# Altium PCB powermodule.PcbDoc (part 2 of 2)
Units mil, origin at the board's own origin, x right, y up, seen from the top; angles counter-clockwise.
Board outline 3937.01 x 1771.65 mil, 2 copper layers (Top, Bottom); 128 components, 96 nets, 567 pads, 424 vias.
Unrouted connection lines stored in the file: 15.
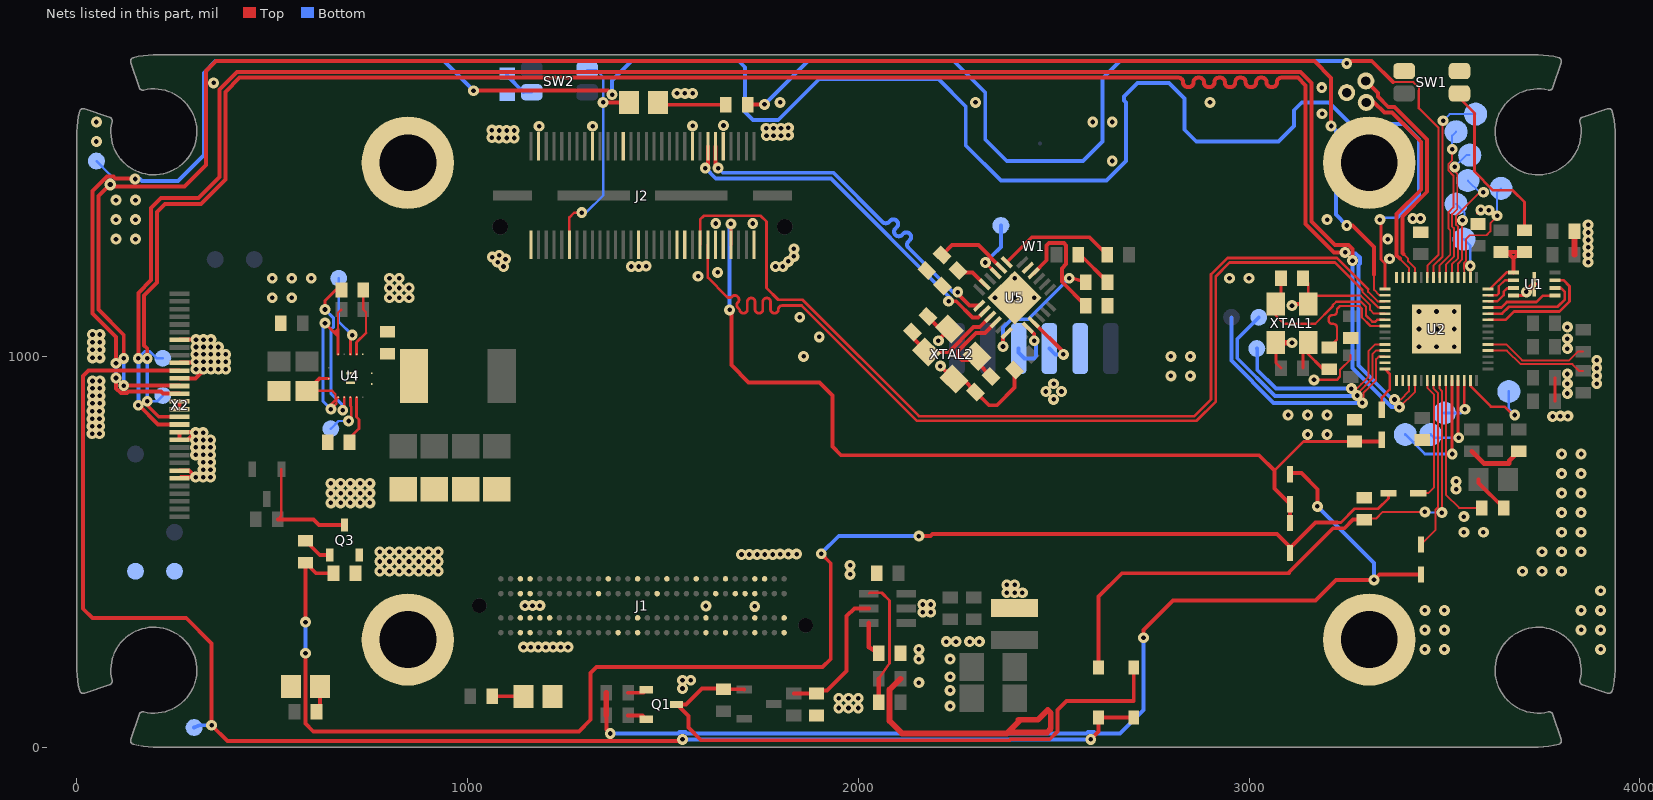
[diagram p2: the nets of this part, all layers, seen from the top]

## Via types
v1: diameter 27.81/27.81 (per signal layer), hole 11.81, Top to Bottom, 420 vias
v2: diameter 29.78/29.78 (per signal layer), hole 13.78, Top to Bottom, 4 vias

## Nets (pads, with @x,y where several pads share a name; then routed paths per layer and width w, separated by ;. In a path a pad name is that pad's centre, name@x,y a point inside that pad or via, vN(x,y) a via of type N, cw(c..) or ccw(c..) an arc to the next point about the centre after c; other vN are vias at no path point) (continued)
GND: C1.2 C3.1 C5.2 C6.2 C9.1 C13.2 C15.1 C16.2 C19.2 C23.2 C24.2 C25.2 C28.2 C29.2 C30.2 C31.2 C32.2 C33.2 C34.2 C35.2 C36.1 D10.C D11.C GND_SER.P$2 H1.P$1 H2.P$1 H3.P$1 H4.P$1 J1.A03 J1.A04 J1.A07 J1.A13 J1.A15 J1.A22 J1.A24 J1.A27 J1.A30 J1.B03 J1.B04 J1.B05 J1.B06 J1.B15 J1.B22 J1.B27 J1.B30 J1.C03 J1.C04 J1.C11 J1.C17 J1.C23 J1.C25 J1.C26 J1.C27 J1.D03 J1.D04 J1.D12 J1.D15 J1.D18 J1.D21 J1.D24 J1.D27 J1.D28 J2.1 J2.10 J2.11 J2.18 J2.21 J2.31 J2.36 J2.44 J2.58 J2.59 Q1.2 Q3.2 R8.1 R13.2 R16.1 R20.1 R24.2 R26.2 R27.2 R28.2 SW1.1 SW1.2 TP14.TP TP15.TP U1.4 U1.9 U2.19 U2.57 U2.58 U2.59 U2.60 U2.61 U2.62 U2.63 U2.64 U2.65 U2.66 U4.P$2 U4.P$3 U4.P$14 U5.25 W1.GND X2.7 X2.10 X2.12 X2.15 X2.16 X2.19 X2.20 X2.24 X2.25 XTAL1.2 XTAL1.4 XTAL2.2 XTAL2.4 | length 3301.5
  Top w5: 3231.8,947.08 3232.8,948.08 3232.8,965.11 3260,992.31 3260,1003 ; 3265,1155.37 3286.13,1155.37 3310.09,1131.41 3310.09,1118.91 3319.62,1109.38 U2.19@3348,1109.38
  Top w6: C24.2@589.49,911.81 653.19,911.81 661.81,903.19 661.81,888.19 ; v1(650,865) 664.31,879.31 664.31,890.69 ; 668.5,1051.5 668.5,1111.5 677,1120
  Top w7: 620.79,943.11 U4.P$2@644.88,943.11 ; v1(650,865) 650,876.38 661.81,888.19 664.31,890.69 U4.P$3@668.5,894.88 ; U4.P$14@668.5,1005.12 668.5,1051.5 ; XTAL1.2@3069,1035 3069,983 3082,970 ; C9.1@3138,1200 3151.5,1186.5 XTAL1.4@3151.5,1134.5 ; XTAL1.4@3150,1134.5 3170.87,1155.37 3265,1155.37 ; v1(3166.37,940) 3224.72,940 3231.8,947.08 ; v1@3584,1366 v1(3593,1375) ; 3783,885 3783,945
  Top w8: v1(635,1085) 660,1060 ; U1.4@3676.94,1155.47 3700.47,1155.47 v1(3710,1165) ; 660,1060 660,1061.5 668.5,1070 668.5,1051.5 660,1060
  Top w10: X2.25@262.95,687.99 265.96,691 v1(304,691) 287.32,707.68 X2.24@262.95,707.68 ; X2.16@262.95,865.16 X2.15@262.95,884.84 ; X2.12@262.95,943.9 303.9,943.9 324,964 v1(324,967) ; X2.10@262.95,983.27 263.86,984.17 293.88,984.17 295.7,986 v1(324,986) ; X2.7@262.95,1042.32 263.63,1043 v1(305,1043) ; v1(304,805) v1@302.9,806.1 ; C24.2@589.49,911.81 620.79,943.11 ; 1411,81 1448,81 Q1.2@1457.5,71.5 ; C36.1@2172.5,1096.5 C36.1@2177.8,1101.8 2209.25,1070.35 XTAL2.2@2233.34,1070.35 ; v1(2205,1040) 2205,1042 XTAL2.2@2233.34,1070.35 ; v1(2210,975) 2243.35,941.65 2244.66,941.65 2267.75,941.65 C35.2@2300.2,909.2 2334.4,875 2355,875 2400.2,920.2 C33.2@2400.2,965.2 ; XTAL2.2@2233.34,1063.34 XTAL2.2@2233.34,1070.35 ; C32.2@2563,1260 2568,1260 R27.2@2638,1190 ; v1(3110,1130) 3114.5,1134.5 3150,1134.5 XTAL1.4@3151.5,1134.5 ; v1@302.9,806.1 283.21,786.42 X2.20@262.95,786.42 X2.19@262.95,806.1 v1@302.9,806.1
  Top w12: 3570,757 3601,726 3666.34,726 3666.34,733.34 C13.2@3690,757
  Top w15: 2108,175 2080,147 2080,67.19 2112.19,35 2380,35 2382.5,37.5 ; XTAL1.2@3068.5,1035.5 3069,1035 v1(3110,1035) ; v1(3710,1165) U1.9@3730,1185 ; 3833,1260 C1.2@3833,1320 ; 2382.5,37.5 2482.75,37.5 2492.5,47.25 2492.5,87.5 2485,95 2460,70 2410,70 2410,65 2382.5,37.5
  Bottom w8: v1(635,1085) 630,1080 630,885 v1(650,865)
  other v1: 1950,100 1975,100 2000,100 2235,105 1950,125 1975,125 2000,125 2235,145 1550,150 2155,165 1550,171 1571,171 2235,180 2235,225 3450,250 3500,250 3900,250 1143,256 1162,256 1181,256 1200,256 1219,256 1238,256 1257,256 2225,270 2250,270 2285,270 2310,270 3450,300 3500,300 3850,300 3900,300 3450,350 3500,350 3850,350 3900,350 1735,360 1610,361 1147,362 1166,362 1185,362 3900,400 1979,442 775,450 800,450 825,450 850,450 875,450 900,450 925,450 3700,450 3750,450 3800,450 1979,465 775,475 800,475 825,475 850,475 875,475 900,475 925,475 1701,493 1721,493 1741,493 1761,493 1781,493 1800,494 1821,494 1842,494 775,500 800,500 825,500 850,500 875,500 900,500 925,500 3750,500 3800,500 3850,500 3550,550 3600,550 3800,550 3850,550 3550,590 3800,600 3850,600 650,625 675,625 700,625 725,625 750,625 650,650 675,650 700,650 725,650 750,650 3800,650 3850,650 3530,660 650,675 675,675 700,675 725,675 750,675 3530,680 323,691 342,691 3800,700 3850,700 323,710 342,710 323,729 342,729 304,748 323,748 342,748 3800,750 3850,750 304,767 323,767 342,767 304,786 323,786 342,786 3150,800 3200,800 39,802 58,802 323,805 39,821 58,821 39,840 58,840 3777,846 3797,847 3816,847 3100,850 3150,850 3200,850 39,860 58,860 40,880 59,880 2500,890 40,899 59,899 3815,905 2480,910 2520,910 40,918 59,918 2500,930 3815,930 3890,930 40,937 59,937 2800,950 2850,950 3890,950 3815,955 305,967 343,967 362,967 381,967 3890,970 305,986 343,986 362,986 381,986 3890,990 40,996 59,996 1860,1000 2800,1000 2850,1000 305,1005 324,1005 343,1005 362,1005 381,1005 40,1017 59,1017 3815,1020 305,1024 324,1024 343,1024 362,1024 40,1036 59,1036 324,1043 343,1043 3815,1045 1900,1050 40,1056 59,1056 3815,1075 1850,1100 500,1150 550,1150 800,1150 825,1150 850,1150 2350,1150 2400,1150 2450,1150 800,1175 825,1175 850,1175 500,1200 550,1200 600,1200 800,1200 825,1200 2400,1200 2950,1200 3000,1200 1590,1205 1640,1215 1092,1230 1419,1230 1438,1230 1788,1230 1807,1230 1457,1231 1077,1241 3868,1241 1821,1243 1097,1249 3360,1250 1063,1254 1835,1256 1081,1259 3868,1260 1835,1275 3868,1279 3868,1298 100,1300 150,1300 3355,1300 3868,1317 3868,1337 1635,1340 1730,1340 100,1350 150,1350 3200,1350 3419,1353 3439,1353 3614,1374 100,1400 150,1400 2650,1500 50,1550 1080,1559 1100,1559 1119,1559 1062,1560 1765,1565 1783,1565 1802,1565 1821,1566 1081,1578 1100,1578 1119,1578 1062,1579 1764,1584 1783,1584 1802,1584 1821,1585 1183,1589 1320,1589 1576,1590 1655,1591 50,1600 2600,1600 2650,1600 3187,1621 1800,1650 2300,1650 2900,1650 1536,1673 1556,1673 1576,1673 3186,1688 350,1700
GPIO0: U2.2 XP1.P$1 | length 104.9
  Top w6: v1(3566.09,1231.32) 3566.63,1230.79 U2.2@3566.63,1202
  Bottom w6: XP1.P$1@3550,1300 3566.09,1283.91 v1(3566.09,1231.32)
GPIO1: U2.3 XP11.P$1 | length 293
  Top w5: U2.3@3550.88,1202 3550.88,1223.34 3549.69,1224.53 3549.69,1238.12 3555,1243.43 3555,1300 3565,1310 3607.8,1310 3617.8,1320 3617.8,1341.11 3635,1358.31 v1(3635,1360)
  Bottom w5: v1(3635,1360) 3635,1420 XP11.P$1@3645,1430
GPIO2: U2.4 XP2.P$1 | length 203.6
  Top w5: U2.4@3535.13,1202 3535.13,1237.7 3545,1247.57 3545,1346.8 v1(3546.41,1348.2)
  Bottom w5: XP2.P$1@3530,1390 3551.41,1368.59 3551.41,1353.2 v1(3546.41,1348.2)
GPIO3: U2.5 XP3.P$1 | length 313.8
  Top w5: U2.5@3519.38,1202 3519.38,1236.09 3535,1251.72 3535,1331.41 3530,1336.41 3530,1360 3590,1420 v1(3600,1420)
  Bottom w5: XP3.P$1@3560,1450 3590,1420 v1(3600,1420)
GPIO4: U2.6 XP4.P$1 | length 354.2
  Top w5: U2.6@3503.63,1202 3503.63,1234.48 3525,1255.86 3525,1327.27 3520,1332.27 3520,1364.14 3532.93,1377.07 3532.93,1467.07 3525,1475 3525,1483.59 v1(3526.41,1485)
  Bottom w5: v1(3526.41,1485) 3556.41,1515 XP4.P$1@3565,1515
GPIO5: U2.7 XP5.P$1 | length 405.3
  Top w5: U2.7@3487.88,1202 3487.88,1232.88 3515,1260 3515,1323.12 3510,1328.12 3510,1368.28 3522.93,1381.21 3522.93,1462.93 3510,1475.86 3510,1491.8 3520,1501.8 v1(3520,1530)
  Bottom w5: v1(3520,1530) 3520,1565 XP5.P$1@3530,1575
GPIO6: U2.8 XP10.P$1 | length 501.6
  Top w5: U2.8@3472.12,1202 3472.13,1232.28 3495.5,1255.65 3495.5,1601.92 v1(3496.79,1603.21)
  Bottom w5: v1(3496.79,1603.21) 3513.58,1620 XP10.P$1@3580,1620
GPIO7: R23.2 U2.9 | length 2691.6
  Top w5: 3368.08,1701.92 3420.86,1701.92 3434.56,1688.22 3434.56,1680 ; U2.9@3456.37,1202 3456.38,1231.38 3485,1260
  Top w6: 3434.56,1680 3434.56,1635.44 3485,1585 3485,1260
  Top w10: R23.2@1717,1644 1727.4,1645 v1(1760,1645) ; v1(3250,1750) 3255.78,1755.78 3314.22,1755.78 3368.08,1701.92
  Bottom w10: v1(1760,1645) 1870.78,1755.78 2244.22,1755.78 2325,1675 2325,1555 2380,1500 2575,1500 2625,1550 2625,1710.78 2670,1755.78 3244.22,1755.78 v1(3250,1750)
GPIO8_TX1: U2.11 X3.P$2 | length 616.8
  Top w5: 3395.61,1261.61 3407.07,1250.14 3407.07,1243.07 3425.13,1225.02 3425.13,1202.25 U2.11@3424.87,1202
  Top w10: X3.P$2@3299,1705 3330,1674 3330,1665 3356.28,1638.72 3372.11,1638.72 3455.94,1554.88 3455.94,1421.33 3393,1358.38 3393,1264.21 3395.61,1261.61
GPIO9_RX1: U2.12 X4.P$2 | length 568.6
  Top w5: 3386,1250 3409.13,1226.88 U2.12@3409.12,1202
  Top w10: X4.P$2@3300,1650 3320,1650 3346.28,1623.72 3365.9,1623.72 3440.94,1548.67 3440.94,1427.54 3378,1364.6 3378,1258 3386,1250
GPIO10: U2.13
GPIO11: U2.14
GPIO12: U2.15 X2.14 | length 5672.2
  Top w7: v1(3335,1350) 3337.59,1347.41 3337.59,1247.79 3348,1237.38 U2.15@3348,1172.38
  Top w10: v1(100,944.68) 100,918.26 112.17,906.09 127.83,906.09 131.74,910 215,910 220.47,904.53 X2.14@262.95,904.53 ; v1(100.25,982.49) 100.25,1049.75 40,1110 40,1423.13 76.76,1459.89 93.24,1459.89 98.13,1455 148.08,1455 v1(149.17,1453.91) ; v1(1015,1680) 1360,1680 v1(1370,1670)
  Bottom w7: v1(3335,1350) 3340,1355 3380,1355
  Bottom w10: v1(100,944.68) 100,982.24 v1(100.25,982.49) ; v1(149.17,1453.91) 161.44,1453.91 166.48,1448.86 258.86,1448.86 325,1515 325,1725.78 355,1755.78 939.22,1755.78 v1(1015,1680) ; v1(1370,1670) 1370,1705.78 1420,1755.78 1694.22,1755.78 1710,1740 1710,1625 1730,1605 1795,1605 1900,1710 2205,1710 2275,1640 2275,1540 2365,1450 2635,1450 2685,1500 2685,1650 2680,1655 2680,1665 2715,1700 2795,1700 2835,1660 2835,1580 2865,1550 3075,1550 3115,1590 3115,1630 3135,1650 3205,1650 3260,1595 3395,1595 3435,1555 3435,1410 3380,1355
GPIO16: U2.27
GPIO18: U2.29
GPIO19: U2.30
GPIO22: D7.2 U2.34 | length 326.7
  Top w5: D7.2@3433.25,650 3458.63,650 3473.63,665 3473.63,902.23 3456.38,919.48 U2.34@3456.37,938
GPIO23: D4.2 U2.35 | length 442.6
  Top w5: D4.2@3440,518.25 3477.22,555.47 3477.22,606.8 3483.63,613.2 3483.63,628.63 3483.63,650 3483.63,906.38 3472.13,917.88 U2.35@3472.12,938
GPIO24: C16.1 D5.2 U2.36 | length 1492.6
  Top w5: C16.1@3295,582 3298,585 3325,585 3341.91,601.91 v1(3450,601.91) ; U2.36@3487.88,938 3487.88,917.13 3493.63,911.38 v1(3493.63,600)
  Top w10: D5.2@2615,204 2615,385 2675,445 3100,445 ; 3102,445 3100,445 ; C16.1@3295,582 3266.09,582 3244.09,560 3215,560 3100,445
  Bottom w5: v1(3450,601.91) 3451.91,600 v1(3493.63,600)
GPIO25: R5.2 U2.37 | length 398.2
  Top w5: U2.37@3503.63,938 3503.63,646.38 3538,612 R5.2@3596,612
GPIO26_ADC0: U2.38 XP6.P$1 | length 329
  Top w7: U2.38@3519.38,938 3519.38,750.66 v1(3520.03,750)
  Bottom w7: XP6.P$1@3400,800 3450,750 v1(3520.03,750)
GPIO27_ADC1: U2.39 XP7.P$1 | length 222
  Top w7: U2.39@3535.13,938 3535.13,793.51 v1(3536.78,791.85)
  Bottom w7: XP7.P$1@3465,800 3473.15,791.85 v1(3536.78,791.85)
GPIO28: D3.2 U2.28 | length 117.6
  Top w7: D3.2@3340,863.25 3340,895 3360,915 3360,955.63 U2.28@3348,967.62
GPIO28_ADC2: U2.40 XP8.P$1 | length 130.5
  Top w7: U2.40@3550.88,938 3550.88,866.45 v1(3552.53,864.79)
  Bottom w7: XP8.P$1@3500,855 3542.74,855 v1(3552.53,864.79)
GPIO29_ADC3: U2.41 XP9.P$1 | length 224.1
  Top w7: U2.41@3566.63,938 3566.63,924.23 3619.45,871.41 3654.21,871.41 3675.62,850 v1(3680,850)
  Bottom w7: XP9.P$1@3665,910 3665,865 v1(3680,850)
HUB_RESET: TP19.TP U5.15 | length 160.3
  Top w8: v1(2325.34,1240.34) 2351.56,1214.13 U5.15@2351.56,1212.58
  Bottom w7: 2342.5,1257.5 2350,1265
  Bottom w10: v1(2325.34,1240.34) 2342.5,1257.5 2365,1280 TP19.TP@2365,1335
N$1: R1.1 SW1.4 | length 448.2
  Top w6: SW1.4@3538.73,1673 3538.73,1661.27 3553,1647
  Top w7: 3553,1647 3577,1623 3577,1473 3625,1425 3650,1425 3675,1425 3705,1395 R1.1@3705,1323
N$2: C26.2 L2.P$2 U4.P$8 U4.P$9 U4.P$15 U4.P$16
N$3: C25.1 U4.P$6 | length 127.4
  Top w7: C25.1@698,780 698,791.01 721.99,815 721.99,838.41 715.75,844.65 U4.P$6@715.75,894.88
N$4: R16.2 | length 367.7
  Top w10: 1835,137 R16.2@1893,137 1894.4,145 1920,145 1970,195 1970,335 1990,355 2027,355
N$5: R18.1 | length 331.3
  Top w5: 2027,392.4 2029.6,395
  Top w7: 2029.6,395 2060,395 2080,375 2080,214.45 2052,175
  Top w11.81: R18.1@2052,115 2052,175
N$6: C20.1 | length 91.5
  Top w11.81: 2027,317.6 2027,255.6 C20.1@2052,240
N$7: R24.1 SW2.4 | length 86.4
  Bottom w6: SW2.4@1143.4,1676 SW2.4@1164.27,1676
  Bottom w10: R24.1@1101,1724 1101,1718.4 SW2.4@1143.4,1676
N$8: C20.2 L1.2
  other v1: 2155,225 2155,250 2165,345 2185,345 2165,365 2185,365 2380,395 2400,395 2420,395 2380,415 2400,415
N$9: D12.C J2.49 SW2.1 | length 596.9
  Top w6: J2.49@1260.55,1285.75 1260.55,1355.75 1272.8,1368 v1(1292,1368)
  Top w10: v1(1347,1650) D12.C@1412.6,1650
  Bottom w6: v1(1292,1368) 1303,1368 1347,1412 v1(1347,1650) 1347,1715.09 1329,1733.09 SW2.1@1306,1733.09
N$10: R3.2 XTAL1.3 | length 173.9
  Top w7: 3138,970 3138,1022 XTAL1.3@3151.5,1035.5 ; XTAL1.3@3147.4,1031.4 3147.4,1009.6 3190,967 R3.2@3205,967
  Top w8: XTAL1.3@3147.4,1031.4 XTAL1.3@3151.5,1035.5
N$11: R21.2 U4.P$11 | length 177.8
  Top w6: R21.2@733,1170 733,1120 740,1113 740,1060
  Top w7: U4.P$11@715.75,1005.12 715.75,1035.75
  Top w8: 715.75,1035.75 740,1060
N$12: D12.A R23.1 | length 176.1
  Top w10: D12.A@1487.4,1650 1493.4,1644 R23.1@1661,1644
N$13: TP7.TP U4.P$12 | length 211.2
  Top w7: U4.P$12@700,1005.12 700,1049.69 v1(704.74,1054.43)
  Bottom w7: TP7.TP@670,1200 670,1089.18 v1(704.74,1054.43)
N$14: R21.1 U4.P$4 | length 392.4
  Top w7: v1@684.25,866.02 U4.P$4@684.25,894.88
  Top w8: v1(635,1120) 635,1142.4 662.6,1170 R21.1@677,1170 ; v1(680.5,862.26) v1@684.25,866.02
  Bottom w8: v1(635,1120) 656.99,1098.01 656.99,1075.89 650,1068.9 650,905 680.5,874.5 v1(680.5,862.26)
N$15: D11.A R22.1 | length 79.6
  Top w10: R22.1@1063,130 D11.A@1142.6,130
N$16: TP6.TP U4.P$5 | length 117.5
  Top w6: v1(695.5,834.5) v1@701.49,840.5
  Top w7: U4.P$5@700,894.88 700,873.16 701.99,871.17 701.99,841 v1@701.49,840.5
  Bottom w6: TP6.TP@650,815 669.5,834.5 v1(695.5,834.5)
N$17: R27.1 U5.24 | length 351.3
  Top w10: v1(2370.4,1025.35) 2370.4,1049.69 U5.24@2379.85,1059.14 ; v1(2540,1200) 2548.67,1200 R27.1@2582,1190
  Bottom w10: v1(2370.4,1025.35) 2370.4,1073.45 2391.95,1095 2435,1095 v1(2540,1200)
N$19: C26.1 U4.P$10
N$20: C36.2 U5.21 XTAL2.3 | length 265.6
  Top w10: C36.2@2138.2,1062.2 2138.2,1048.11 2174.65,1011.66 2231.66,1011.66 2295,1075 2310.86,1075 U5.21@2337.42,1101.56
N$21: D7.1 D9.1 R12.2 R13.1 | length 3854.8
  Top w7: 3225,575 3235,575 3270,610 3330,610 3356.75,636.75 D7.1@3356.75,650
  Top w10: v1(585,240) 585,60 605,40 1285,40 1315,70 1315,190 1330,205 1908.79,205 1929.39,225.61 1929.39,470.61 v1(1905,495) ; v1(585,320) R12.2@585,472 612,445 R13.1@657,445 ; v1(2155,540) 2185,540 2190,545 3071.75,545 3105,511.75 D9.1@3105,496.75 3105,510 3170,575 3225,575
  Bottom w10: v1(585,240) v1(585,320) ; v1(1905,495) 1950,540 v1(2155,540)
N$23: C35.1 U5.22 XTAL2.1 | length 264.3
  Top w10: C35.1@2339.8,948.8 2303.35,985.25 2303.35,1000.34 2295.34,1000.34 2285,990 2265,990 2255,1000 2255,1013.79 2301.21,1060 2324.14,1060 U5.22@2351.56,1087.42
N$24: R5.1 | length 99.7
  Top w10: 3587.6,685 3587.6,676.4 R5.1@3652,612
N$25: D6.2 Q1.3 R11.2 | length 1577.7
  Top w10: 1708,147.4 1707.4,148 R11.2@1655,148 1653,150 1600,150 1559,109 Q1.3@1534.5,109 1536,109 1565,80 1565,50 1597.5,17.5 2387.25,17.5 2389.75,20 2490,20 2510,40 2510,95 2532.5,117.5 2705,117.5 D6.2@2705,204
N$26: R26.1 U5.14 | length 194.6
  Top w7: R26.1@2208.24,1253.24 R26.1@2214.8,1259.8
  Top w10: R26.1@2214.8,1259.8 2239.8,1284.8 2307.63,1284.8 U5.14@2365.71,1226.72
N$27: Q1.1 | length 49.6
  Top w10: 1411,139 1450,139 Q1.1@1457.5,146.5
N$28: R25.1 U5.13 | length 302.4
  Top w10: U5.13@2379.85,1240.86 2443.98,1305 2592,1305 R25.1@2637,1260
N$29: Q3.3 | length 308.9
  Top w6: 514,583 523.4,592.4 523.4,711
  Top w10: 514,583 605.6,583 620.1,568.5 Q3.3@685,568.5
N$30: D2.1 D4.1 | length 2858.5
  Top w10: 1355,81 1355,44.78 v1(1365,34.78) ; v1(2730,280) 2730,300 2805,375 3170,375 3223,428 v1(3320,428) 3333.75,441.75 D4.1@3440,441.75 ; D2.1@3105,698.25 3107.75,701 3134,701 3175,660 v1(3175,616)
  Top w15: 1355,81 1355,139
  Bottom w10: v1(1365,34.78) 1538.26,34.78 1542.17,38.69 1557.83,38.69 1561.74,34.78 2583.26,34.78 2587.17,38.69 2602.83,38.69 2606.52,35 2670,35 2730,95 v1(2730,280) ; v1(3175,616) 3320,471 v1(3320,428)
N$31: Q3.1 R12.1 | length 77.6
  Top w10: R12.1@585,528 621.5,491.5 Q3.1@647.5,491.5
N$32: D10.A R19.1 | length 68.9
  Top w10: R19.1@613,90 622.4,99.4 D10.A@622.4,155
N$33: R28.1 U5.17 | length 83.2
  Top w10: R28.1@2254.8,1219.8 2259.59,1215 2292.57,1215 U5.17@2323.28,1184.29
N$34: C34.1 U5.10 | length 323.6
  Top w10: U5.10@2448.44,1212.58 2482,1246.14 2482,1283.84 2487.86,1289.7 2526.14,1289.7 2532,1283.84 2532,1236.16 2521.09,1225.25 2521.09,1190.91 C34.1@2582,1130
PRTPWR2: U5.11
QSPI_SD0: U1.5 U2.53 | length 183.6
  Top w7: U2.53@3612,1125.13 3646.03,1125.13 3660,1139.1 3735.68,1139.1 3752.06,1155.47 U1.5@3783.06,1155.47
QSPI_SD1: U1.2 U2.55 | length 91.6
  Top w6: U2.55@3612,1156.63 3634.84,1156.63 3639.37,1161.16 3639.37,1179.37 3655,1195 U1.2@3676.79,1195
  Top w7: U1.2@3676.79,1195 U1.2@3676.94,1194.84
QSPI_SD2: U1.3 U2.54 | length 84.2
  Top w6: U2.54@3612,1140.88 3635.88,1140.88 3651.57,1156.57 3651.57,1165.18 3661.54,1175.16 U1.3@3676.94,1175.16
QSPI_SD3: U1.7 U2.51 | length 310.6
  Top w7: U2.51@3612,1093.63 3656.65,1093.63 3678.13,1115.1 3794.74,1115.1 3820.43,1140.79 3820.43,1179.57 3805,1195 3783.21,1195 U1.7@3783.06,1194.84
QSPI_SLCK: U1.6 U2.52 | length 260.4
  Top w7: U2.52@3612,1109.38 3647.25,1109.38 3664.97,1127.1 3789.77,1127.1 3808.43,1145.76 3808.43,1165.18 3798.46,1175.16 U1.6@3783.06,1175.16
QSPI_SS: R1.2 R2.1 U1.1 U2.56 | length 252.7
  Top w6: U2.56@3612,1172.38 3616.38,1172.38 3659,1215 U1.1@3676.47,1215
  Top w7: U1.1@3676.47,1215 U1.1@3676.94,1214.53
  Top w10: U1.1@3676.94,1214.53 3676.94,1250 ; 3676.94,1250 3693.94,1267 R1.2@3705,1267 R2.1@3645,1267 3660.6,1267 3676.94,1250.65 3676.94,1250
RESET_MCU: J2.9
RESET_USB_HUB: J2.19
RUN: U2.26 | length 642.5
  Top w5: v1(3290,881) 3290,890.06 3293.05,893.11 3293.05,906.46 3307.2,920.61 3307.2,920.92 3325.5,939.22 3325.5,993 3331.63,999.13 U2.26@3348,999.12
  Bottom w10: 2955,1100 2955,989 3063,881 v1(3290,881)
SBUS_TX: TP9.TP U2.16 X2.13 | length 4821.4
  Top w5: X2.13@262.17,925 X2.13@262.95,924.21 ; 3320,1210 3320,1170 3333.38,1156.63 U2.16@3348,1156.63
  Top w10: v1(120,925) X2.13@262.17,925 ; v1(120,995) 120,1055 55,1120 55,1410 v2(85,1440) 90,1435 275,1435 330,1490 330,1730 355.78,1755.78 3167.5,1755.78 3210.26,1713.01 v1(3210.26,1589.74) ; v1(3250,1335) 3265,1335 3320,1280 3320,1210
  Bottom w6: TP9.TP@50,1500 85,1465 v2(85,1440)
  Bottom w10: v1(120,925) v1(120,995) ; v1(3210.26,1589.74) 3222.13,1577.87 3222.13,1362.87 v1(3250,1335)
SCL0: TP17.TP U2.32 X2.18 | length 5020.4
  Top w5: v1(3385,870) 3424.88,909.88 U2.32@3424.87,938
  Top w10: v1(157.19,875) 158.79,875 208,825.79 X2.18@262.95,825.79 ; v1(157.19,995) 157.19,1162.19 190,1195 190,1380 215,1405 311.21,1405 365,1458.79 365,1683.28 410,1728.28 3131.72,1728.28 3160,1700 3160,1345 3220,1285 3255,1285 3265,1275 v1(3265,1245)
  Bottom w7: v1(157.19,995) 162.59,1000.41 162.59,1002.21 172.79,1012.41 187.21,1012.41 204.62,995 TP17.TP@220,995
  Bottom w10: v1(157.19,875) v1(157.19,995) ; v1(3265,1245) 3265,970 3365,870 v1(3385,870)
SCL_VOXL: J2.13 U2.18 | length 2540
  Top w5: 3290,1170 3290,1165.64 3330.52,1125.13 U2.18@3348,1125.13
  Top w7: J2.13@1614.97,1285.75 1614.97,1201.4 1663.18,1153.18 ccw(c1670.08,1160.08) 1676.97,1153.18 cw(c1683.87,1146.29) 1690.76,1153.18 1691.89,1152.05 cw(c1684.99,1145.15) 1691.89,1138.26 ccw(c1698.78,1131.37) 1691.89,1124.48 1696.11,1120.25 ccw(c1705.86,1120.25) 1705.86,1110.5 1706.19,1110.5 ccw(c1706.19,1120.25) 1715.94,1120.25 1715.94,1139.75 cw(c1725.69,1139.75) 1725.69,1149.5 1726.02,1149.5 cw(c1726.02,1139.75) 1735.77,1139.75 1735.77,1120.25 ccw(c1745.52,1120.25) 1745.52,1110.5 1745.85,1110.5 ccw(c1745.85,1120.25) 1755.6,1120.25 1755.6,1139.75 cw(c1765.35,1139.75) 1765.35,1149.5 1765.67,1149.5 cw(c1765.67,1139.75) 1775.42,1139.75 1775.42,1120.25 ccw(c1785.17,1120.25) 1785.17,1110.5 1785.5,1110.5 ccw(c1785.5,1120.25) 1795.25,1120.25 cw(c1805,1120.25) 1805,1130 1855,1130 2150,835 2865,835 2915,885 2915,1205 2950,1240 3220,1240 3290,1170
SDA0: TP16.TP U2.31 X2.17 | length 5025.7
  Top w5: v1(3372.24,889.5) 3387.98,889.5 3409.13,910.64 U2.31@3409.12,938
  Top w10: v1(180,885) 180,875 209.53,845.47 X2.17@262.95,845.47 ; v1(180,995) 180,1020 172.19,1027.81 172.19,1155.98 205,1188.79 205,1370 217.5,1382.5 225,1390 317.43,1390 380,1452.57 380,1677.07 416.21,1713.28 2820,1713.28 cw(c2820,1702.03) 2831.25,1702.03 2831.25,1700.69 ccw(c2842.5,1700.69) 2842.5,1689.44 2846.69,1689.44 ccw(c2846.69,1700.69) 2857.94,1700.69 2857.94,1702.03 cw(c2869.19,1702.03) 2869.19,1713.28 2873.38,1713.28 cw(c2873.38,1702.03) 2884.63,1702.03 2884.63,1700.69 ccw(c2895.88,1700.69) 2895.88,1689.44 2900.08,1689.44 ccw(c2900.08,1700.69) 2911.33,1700.69 2911.33,1702.03 cw(c2922.58,1702.03) 2922.58,1713.28 2926.77,1713.28 cw(c2926.77,1702.03) 2938.02,1702.03 2938.02,1700.69 ccw(c2949.27,1700.69) 2949.27,1689.44 2953.46,1689.44 ccw(c2953.46,1700.69) 2964.71,1700.69 2964.71,1702.03 cw(c2975.96,1702.03) 2975.96,1713.28 2980.15,1713.28 cw(c2980.15,1702.03) 2991.4,1702.03 2991.4,1700.69 ccw(c3002.65,1700.69) 3002.65,1689.44 3006.85,1689.44 ccw(c3006.85,1700.69) 3018.1,1700.69 3018.1,1702.03 cw(c3029.35,1702.03) 3029.35,1713.28 3033.54,1713.28 cw(c3033.54,1702.03) 3044.79,1702.03 3044.79,1700.69 ccw(c3056.04,1700.69) 3056.04,1689.44 3060.23,1689.44 ccw(c3060.23,1700.69) 3071.48,1700.69 3071.48,1702.03 cw(c3082.73,1702.03) 3082.73,1713.28 3125.51,1713.28 3145,1693.79 3145,1338.79 3217.69,1266.09 v1(3246.09,1266.09)
  Bottom w7: v1(180,885) 205,885 TP16.TP@220,900
  Bottom w10: v1(180,885) v1(180,995) ; v1(3246.09,1266.09) 3248.28,1263.91 3272.83,1263.91 3283.91,1252.83 3283.91,1237.17 3280,1233.26 3280,976.21 3366.72,889.5 v1(3372.24,889.5)
SDA_VOXL: J2.15 U2.17 | length 2538.6
  Top w5: 3305,1171.97 3305,1165 3329.13,1140.88 U2.17@3348,1140.88
  Top w7: J2.15@1595.28,1285.75 1595.28,1350.28 1605,1360 1750,1360 1765,1345 1765,1175 1795,1145 1856.97,1145 2154.97,847 2860,847 2903,890 2903,1209.97 2945.03,1252 3224.97,1252 3305,1171.97
SW1: D5.1 D6.1 TP8.TP X2.11 | length 3892.7
  Top w10: X2.11@262.95,963.58 29.46,963.58 15.87,950 15.87,354.13 40,330 280,330 345,265 v1(345,55.87) 385,15.87 1546.09,15.87 v1(1550,19.78) ; v1(2595,19.78) 2615,39.78 D5.1@2615,76 D6.1@2705,76
  Bottom w10: TP8.TP@300,50 313.35,55.87 v1(345,55.87) ; v1(1550,19.78) v1(2595,19.78)
SWCLK: SWCLK.TP U2.24 | length 487.4
  Top w5: v1(3261.99,917.51) 3275.82,917.51 3287.2,928.89 3287.2,929.2 3300,942 3304,946 3305.5,947.5 3305.5,1013.3 3322.83,1030.63 U2.24@3348,1030.62
  Bottom w10: SWCLK.TP@3020,1020 3021,1019 3021,965.43 3068.91,917.51 v1(3261.99,917.51)
SWDIO: SWDIO.TP U2.25 | length 633.1
  Top w5: v1(3276.65,899.91) 3276.65,904.2 3297.2,924.75 3297.2,925.06 3315.5,943.36 3315.5,1006 3324.38,1014.88 U2.25@3348,1014.87
  Bottom w10: SWDIO.TP@3025,1100 2970,1045 2970,995.21 3066.61,898.61 3275.35,898.61 v1(3276.65,899.91)
USB-WIFI_N: U5.2 W1.USB-DM | length 145.8
  Top w10: U5.2@2434.29,1073.28 2450.32,1057.25 v1(2450.32,1040)
  Bottom w10: W1.USB-DM@2410.24,1020 2410.24,1009.76 2425,995 2450,995 2455.32,1000.32 2455.32,1035 v1(2450.32,1040) v1@2450,1040.32
USB-WIFI_P: U5.3 W1.USB-DP | length 156.4
  Top w10: U5.3@2448.44,1087.42 2525,1010.86 v1(2525,1005)
  Bottom w10: W1.USB-DP@2488.98,1020 2503.98,1005 v1(2525,1005)
USB_D_N: U2.46 | length 264.5
  Top w5: U2.46@3612,1014.87 3660.13,1014.88 3695,980 3827.57,980 3844.57,963 3855,963
USB_D_P: U2.47 | length 268.9
  Top w5: U2.47@3612,1030.62 3658.52,1030.63 3699.14,990 3819.57,990 3841.57,1012 3855,1012
VOXL_EN_BUCK: D2.2 D3.1 D9.2 J2.7 R8.2 | length 2455
  Top w7: v1(1674,1339) v1(1674,1339) J2.7@1674.04,1285.75 ; 3065,707.72 3139.28,782 R8.2@3270,782
  Top w10: v1(1670.58,1119) 1675.09,1114.48 1675.09,977.81 1719.41,933.5 1900.5,933.5 1934,900 1934,769 1956,747 3025.72,747 3065,707.72 3065,661.75 D2.2@3105,621.75 D9.2@3105,573.25 ; R8.2@3270,782 3335.25,782 D3.1@3340,786.75
  Bottom w10: v1(1670.58,1119) 1670.58,1335.58 v1(1674,1339)
VOXL_USB_N: J2.12 U5.19 | length 953
  Top w10: J2.12@1634.66,1537.75 1634.66,1481.75 v1(1641.22,1481.75) ; v1(2254.4,1164.4) 2252.11,1162.11 2284.11,1130.11 2308.88,1130.11 U5.19@2309.14,1129.85
  Bottom w10: v1(1641.22,1481.75) 1652.97,1470 1936.21,1470 2062.38,1343.84 ccw(c2070.34,1351.8) 2078.29,1343.84 2081.9,1347.45 cw(c2089.86,1339.49) 2097.81,1347.45 2098.5,1346.75 cw(c2090.55,1338.8) 2098.5,1330.84 2094.89,1327.23 ccw(c2102.84,1319.28) 2094.89,1311.32 2095.59,1310.62 ccw(c2103.55,1318.58) 2111.5,1310.62 2115.11,1314.23 cw(c2123.07,1306.28) 2131.02,1314.23 2131.72,1313.54 cw(c2123.76,1305.59) 2131.72,1297.63 2128.11,1294.02 ccw(c2136.07,1286.07) 2128.11,1278.11 2241.81,1164.4 v1(2254.4,1164.4) v1@2254.11,1164.11
VOXL_USB_P: J2.14 U5.20 | length 953.1
  Top w10: v1(1608.41,1481.75) 1614.97,1481.75 J2.14@1614.97,1537.75 ; v1(2231.2,1141.2) 2250.8,1141.2 2292.56,1099.44 2307.02,1099.44 U5.20@2323.28,1115.71
  Bottom w10: v1(1608.41,1481.75) 1635.15,1455 1930,1455 2235,1150 2235,1145 v1(2231.2,1141.2)
XIN: C9.2 U2.20 XTAL1.1 | length 450.4
  Top w6: XTAL1.1@3068.5,1134.5 3068.5,1104.5 3089.37,1083.63 3169.71,1083.63 3214,1127.91 3214,1130.65 3223.22,1139.87 3286.78,1139.87 3299.59,1127.06 3299.59,1104.56 3315.27,1088.88 3323.88,1088.88 3328.63,1093.63 U2.20@3348,1093.63
  Top w7: XTAL1.1@3068.5,1134.5 3082,1148 C9.2@3082,1200
XOUT: R3.1 U2.21 | length 293.5
  Top w6: R3.1@3205,1023 3225,1043 3225,1073.89 ccw(c3215.75,1073.89) 3215.75,1083.14 3213.02,1083.14 cw(c3213.02,1092.39) 3203.77,1092.39 3203.77,1096.5 cw(c3213.02,1096.5) 3213.02,1105.75 3215.75,1105.75 ccw(c3215.75,1115) 3225,1115 3225,1121.09 3232.78,1128.87 3282.22,1128.87 3288.59,1122.5 3288.59,1100 3310.72,1077.88 U2.21@3348,1077.88
pads on no net: C2.1 C2.2 C4.1 C4.2 C7.1 C7.2 C8.1 C8.2 C10.1 C10.2 C11.1 C11.2 C12.1 C12.2 C14.1 C14.2 C17.1 C17.2 C18.1 C18.2 C21.1 C21.2 C22.1 C22.2 C27.1 C27.2 D1.A D1.C J1.A05 J1.A06 J1.A08 J1.A09 J1.A10 J1.A11 J1.A12 J1.A14 J1.A16 J1.A17 J1.A18 J1.A19 J1.A20 J1.A21 J1.A23 J1.A25 J1.A26 J1.A28 J1.A29 J1.B07 J1.B08 J1.B09 J1.B10 J1.B11 J1.B12 J1.B13 J1.B14 J1.B16 J1.B17 J1.B18 J1.B19 J1.B20 J1.B21 J1.B23 J1.B24 J1.B25 J1.B26 J1.B28 J1.B29 J1.C05 J1.C06 J1.C07 J1.C08 J1.C09 J1.C10 J1.C12 J1.C13 J1.C14 J1.C15 J1.C16 J1.C18 J1.C19 J1.C20 J1.C21 J1.C22 J1.C24 J1.C28 J1.C29 J1.C30 J1.D05 J1.D06 J1.D07 J1.D08 J1.D09 J1.D10 J1.D11 J1.D13 J1.D14 J1.D16 J1.D17 J1.D19 J1.D20 J1.D22 J1.D23 J1.D25 J1.D26 J1.D29 J1.D30 J2.2 J2.3 J2.4 J2.5 J2.6 J2.8 J2.16 J2.20 J2.22 J2.23 J2.24 J2.25 J2.26 J2.27 J2.28 J2.29 J2.30 J2.32 J2.33 J2.34 J2.35 J2.37 J2.38 J2.39 J2.40 J2.41 J2.42 J2.43 J2.45 J2.46 J2.47 J2.48 J2.50 J2.51 J2.52 J2.53 J2.54 J2.55 J2.56 J2.57 J2.60 J2.61 J2.62 J2.63 J2.64 Q2.1 Q2.2 Q2.3 Q4.1 Q4.2 Q4.3 R6.1 R6.2 R7.1 R7.2 R9.1 R9.2 R10.1 R10.2 R14.1 R14.2 R15.1 R15.2 R17.1 R17.2 SW1.3 SW2.2 SW2.3 TP11.TP U3.1 U3.2 U3.3 U3.4 U3.5 U3.6 U5.6 U5.7 U5.8 U5.12 U5.23 W1.IO1 W1.IO2 W1.P$1 X2.8 X2.9

## Polygon pours and split planes (outlines as drawn)
N$19 on Top "Polygon_1_Net_N$19" (solid, remove dead copper, pour order 6): 727.51,1073 727.51,989.76 748,989.76 748,1038.76 756.24,1047 816.24,1047 828,1058.76 828,1096.24 821.24,1103 773.76,1103 767,1096.24 767,1086.24 753.76,1073
+5V on Top "Polygon_3_Net_+5V" (solid, remove dead copper, pour order 19): 1032.93,715 1122.93,715 1145,692.93 1145,657.07 980,492.07 980,237.93 1012.93,205 1117.07,205 1130,217.93 1130,447.93 1177.7,495.63 1275,528.07 1275,787.07 1232.07,830 1042.93,830 1020,807.07 1020,727.93
+5V on Top "Polygon_2_Net_+5V" (solid, remove dead copper, pour order 26): 218,673 341,673 341,541 218,541
+5V on Top "Polygon_1_Net_+5V" (solid, remove dead copper, pour order 31): 727,913 727,722 1123,722 1123,903 1038.76,903 1032,896.24 1032,871.24 1013.76,853 761.24,853 738,876.24 738,913
N$2 on Top "Polygon_1_Net_N$2" (solid, remove dead copper, pour order 16): 690,978.5 748.55,978.5 757.53,987.47 761.5,991.45 761.5,1016.45 778.55,1033.5 795,1033.5 966.45,1033.5 978.5,1021.45 978.5,878.55 966.45,866.5 778.55,866.5 766.5,878.55 766.5,898.55 752.53,912.53 748.55,916.5 676.5,916.5 676.5,978.5
N$8 on Top "Polygon_5_Net_N$8" (solid, remove dead copper, pour order 12): 2335.5,428.11 2335.5,328.5 2460.11,328.5 2465.5,333.89 2465.5,407.11 2432.11,440.5 2347.89,440.5
N$8 on Top "Polygon_4_Net_N$8" (solid, remove dead copper, pour order 3): 2168.5,218.55 2168.5,256.45 2161.45,263.5 2111.5,263.5 2111.5,211.5 2161.45,211.5
N$8 on Top "Polygon_1_Net_N$8" (solid, remove dead copper, pour order 4): 2197.5,327.5 2158.96,327.5 2148.96,337.5 2102.5,337.5 2102.5,372.5 2148.96,372.5 2158.96,382.5 2197.5,382.5
+12V on Top "Polygon_4_Net_+12V" (solid, remove dead copper, pour order 27): 235,1055 235,1177.07 277.93,1220 452.07,1220 470,1202.07 470,1157.93 463.54,1151.46 367.07,1055
+12V on Top "Polygon_3_Net_+12V" (solid, remove dead copper, pour order 37): 447,1053 447,957 673,957 673,983 661.24,983 658,986.24 658,1053
+12V on Top "Polygon_1_Net_+12V" (solid, remove dead copper, pour order 14): 2296.04,467.5 2102.5,467.5 2102.5,377.5 2146.04,377.5 2156.04,387.5 2202.5,387.5 2202.5,378.96 2208.96,372.5 2321.04,372.5 2327.5,378.96 2327.5,436.04
+1V1 on Top "Polygon_3_Net_+1V1" (solid, remove dead copper, pour order 10): 3592.5,1032.5 3592.5,997.5 3547.5,997.5 3547.5,1133.96 3543.96,1137.5 3416.04,1137.5 3412.5,1133.96 3412.5,1032.5 3382.5,1032.5 3382.5,1057.5 3392.5,1057.5 3392.5,1141.04 3408.96,1157.5 3551.04,1157.5 3567.5,1141.04 3567.5,1032.5
+1V1 on Top "Polygon_2_Net_+1V1" (solid, remove dead copper, pour order 1): 3702.5,1097.5 3702.5,1052.5 3673.96,1052.5 3651.46,1075 3673.96,1097.5
+1V1 on Top "Polygon_1_Net_+1V1" (solid, remove dead copper, pour order 5): 3742.5,967.5 3691.04,967.5 3651.04,1007.5 3607.5,1007.5 3607.5,992.5 3638.96,992.5 3682.5,948.96 3682.5,928.96 3698.96,912.5 3742.5,912.5
+3V3 on Top "Polygon_7_Net_+3V3" (solid, remove dead copper, pour order 8): 2481.5,360 2481.5,281.5 2568.5,281.5 2568.5,368.5 2481.5,368.5
+3V3 on Top "Polygon_5_Net_+3V3" (solid, remove dead copper, pour order 25): 192.93,774 271,774 271,722 188,722 188,769.07
+3V3 on Top "Polygon_4_Net_+3V3" (solid, remove dead copper, pour order 0): 3577.5,1221.04 3577.5,1167.5 3592.5,1167.5 3592.5,1245.59 3582.95,1226.48
+3V3 on Top "Polygon_3_Net_+3V3" (solid, remove dead copper, pour order 15): 2463.5,303.5 2331.5,303.5 2331.5,253.55 2351.5,233.55 2351.5,81.45 2343.55,73.5 2138.5,73.5 2138.5,133.5 2096.5,133.5 2096.5,88.55 2116.5,68.55 2116.5,46.5 2378.5,46.5 2378.5,73.55 2386.45,81.5 2431.45,81.5 2443.5,93.55 2443.5,243.55 2446.45,246.5 2463.5,246.5
+3V3 on Top "Polygon_2_Net_+3V3" (solid, remove dead copper, pour order 38): 3612.5,1197.5 3612.5,1037.5 3572.5,1037.5 3572.5,1143.96 3553.96,1162.5 3396.04,1162.5 3387.5,1153.96 3387.5,1062.5 3377.5,1062.5 3377.5,1027.5 3407.5,1027.5 3407.5,1002.5 3537.5,1002.5 3537.5,987.5 3631.04,987.5 3642.5,976.04 3642.5,933.96 3631.04,922.5 3583.96,922.5 3577.5,928.96 3577.5,942.5 3352.5,942.5 3352.5,1197.5
+3V3 on Top "Polygon_1_Net_+3V3" (solid, remove dead copper, pour order 11): 3741.04,907.5 3696.04,907.5 3677.5,926.04 3677.5,941.04 3631.04,987.5 3582.5,987.5 3582.5,903.96 3618.96,867.5 3683.96,867.5 3688.96,862.5 3741.04,862.5 3747.5,868.96 3747.5,901.04
GND on Top "Polygon_17_Net_GND" (solid, remove dead copper, pour order 29): 2113.55,1353.5 2098.55,1353.5 1945.05,1200 2198.55,946.5 2348.55,946.5 2448.55,846.5 2801.45,846.5 2853.5,898.55 2853.5,1003.5 2603.5,1003.5 2603.5,1098.55 2653.5,1148.55 2653.5,1378.5 2138.55,1378.5
GND on Top "Polygon_16_Net_GND" (solid, remove dead copper, pour order 28): 3443.96,1652.5 3601.04,1652.5 3617.5,1636.04 3617.5,1388.96 3552.5,1323.96 3552.5,1197.5 3462.5,1197.5 3462.5,1633.96
GND on Top "Polygon_14_Net_GND" (solid, remove dead copper, pour order 32): 3503.5,1196.5 3346.5,1196.5 3346.5,1596.5 3246.5,1596.5 3246.5,1753.5 3403.5,1753.5 3403.5,1651.45 3503.5,1551.45
GND on Top "Polygon_9_Net_GND" (solid, remove dead copper, pour order 30): -53.5,1453.5 296.5,1453.5 296.5,1803.5 3253.5,1803.5 3253.5,1401.45 3353.5,1301.45 3353.5,953.5 3453.5,953.5 3453.5,796.5 3298.55,796.5 3196.5,898.55 3196.5,1248.55 3096.5,1348.55 3096.5,1598.55 3048.55,1646.5 453.5,1646.5 453.5,1398.55 401.45,1346.5 303.5,1346.5 303.5,496.5 -53.5,496.5
GND on Top "Polygon_8_Net_GND" (solid, remove dead copper, pour order 23): 2896.5,-3.5 2896.5,393.5 3638.55,393.5 3846.5,601.45 3846.5,903.5 4003.5,903.5 4003.5,-3.5
GND on Top "Polygon_7_Net_GND" (solid, remove dead copper, pour order 35): 1566.36,1238.5 1811.45,1238.5 1823.5,1226.45 1823.5,1173.5 1881.45,1173.5 2181.45,873.5 2843.55,873.5 2876.5,906.45 2876.5,1211.45 2938.55,1273.5 3246.45,1273.5 3251.45,1268.5 3256.45,1268.5 3346.45,1178.5 3358.45,1178.5 3348.5,1168.55 3348.5,1101.55 3338.55,1111.5 3318.55,1111.5 3283.55,1146.5 3203.55,1146.5 3166.5,1183.55 3166.5,1208.55 3158.55,1216.5 2961.45,1216.5 2953.5,1208.55 2953.5,888.55 2871.45,806.5 2104.55,806.5 1844.55,1066.5 1572.98,1066.5
GND on Top "Polygon_5_Net_GND" (solid, remove dead copper, pour order 41): 1045,1605 1045,1195 1855,1195 1855,1605
GND on Top "Polygon_4_Net_GND" (solid, remove dead copper, pour order 40): 1095,450 1095,245 1905,245 1905,505 1095,505
GND on Top "Polygon_3_Net_GND" (solid, remove dead copper, pour order 43): -205,2155 -205,-255 4055,-255 4055,2155
GND on Top "Polygon_1_Net_GND" (solid, remove dead copper, pour order 39): 3762,1123 3762,847 3950,847 3950,1123
N$8 on Bottom "Polygon_3_Net_N$8" (solid, remove dead copper, pour order 7): 2198.5,338.5 2198.5,223.55 2181.45,206.5 2143.55,206.5 2131.5,218.55 2131.5,261.45 2143.55,273.5 2163.55,273.5 2171.5,281.45 2171.5,338.5
N$8 on Bottom "Polygon_2_Net_N$8" (solid, remove dead copper, pour order 13): 2197.5,327.5 2152.5,327.5 2152.5,382.5 2196.04,382.5 2206.04,372.5 2323.96,372.5 2337.5,386.04 2337.5,421.04 2348.96,432.5 2421.04,432.5 2442.5,411.04 2442.5,378.96 2431.04,367.5 2376.04,367.5 2351.04,342.5 2206.04,342.5 2197.5,333.96
+12V on Bottom "Polygon_2_Net_+12V" (solid, remove dead copper, pour order 36): 351,1271 351,1180.93 374.93,1157 454.07,1157 478,1180.93 478,1271
+3V3 on Bottom "Polygon_8_Net_+3V3" (solid, remove dead copper, pour order 9): 2481.5,363.5 2481.5,288.55 2508.55,261.5 2536.45,261.5 2568.5,293.55 2568.5,320 2568.5,363.5
+3V3 on Bottom "Polygon_6_Net_+3V3" (solid, remove dead copper, pour order 2): 197,776 226,776 226,718 188,718 188,759.86 171.86,776
GND on Bottom "Polygon_18_Net_GND" (solid, remove dead copper, pour order 24): 1396.5,1696.5 1646.5,1696.5 1646.5,1546.5 2246.5,1546.5 2246.5,1396.5 2803.5,1396.5 2803.5,1496.5 3296.5,1496.5 3296.5,1296.5 3503.5,1296.5 3503.5,1851.45 3451.45,1903.5 1396.5,1903.5
GND on Bottom "Polygon_15_Net_GND" (solid, remove dead copper, pour order 33): 3447.5,1599.91 3447.5,1757.5 3596.04,1757.5 3742.5,1611.04 3742.5,1353.96 3482.4,1093.87
GND on Bottom "Polygon_13_Net_GND" (solid, remove dead copper, pour order 20): 2240,1305 2240,895 2605,895 2605,1305
GND on Bottom "Polygon_12_Net_GND" (solid, remove dead copper, pour order 34): 1547.48,1553.5 1651.45,1553.5 1701.45,1503.5 2051.45,1503.5 2354.95,1200 2251.45,1096.5 2198.55,1096.5 1963.55,1331.5 1473.47,1331.5
GND on Bottom "Polygon_11_Net_GND" (solid, remove dead copper, pour order 17): 46.5,1053.5 278.5,1053.5 278.5,846.5 46.5,846.5
GND on Bottom "Polygon_10_Net_GND" (solid, remove dead copper, pour order 22): 2696.5,1003.5 2696.5,846.5 2948.55,846.5 3148.55,646.5 3701.45,646.5 3801.45,746.5 3953.5,746.5 3953.5,1203.5 3848.55,1203.5 3796.5,1151.45 3796.5,953.5 3370.45,953.5 3323.5,1000.45 3323.5,1303.5 3196.5,1303.5 3196.5,953.5 3103.5,953.5 3103.5,1153.5 2896.5,1153.5 2896.5,1003.5
GND on Bottom "Polygon_2_Net_GND" (solid, remove dead copper, pour order 42): -56,1856 -56,-56 3956,-56 3956,1856
no net on tDocu "Polygon_2_NoNet" (hatched 90Degree grid 20 track 6, pour order 18): 1512,567 1512,849.46 1774.65,849.46 1774.65,567
no net on tDocu "Polygon_1_NoNet" (hatched 90Degree grid 20 track 6, pour order 21): 1857,1583 1857,1300.58 3240.95,1300.58 3240.95,1583

## Keep-outs
Top:
  region: 2182,523 2182,473.76 2188.76,467 3011.24,467 3023,478.76 3023,511.24 3011.24,523
  region: 1952,623 3016.24,623 3022.12,617.12 3028,611.24 3028,567 1963.76,567 1952,578.76
  region: 1952,723 3016.24,723 3022.12,717.12 3028,711.24 3028,667 1963.76,667 1952,678.76
  region: 1952,823 3016.24,823 3022.12,817.12 3028,811.24 3028,767 1963.76,767 1952,778.76
Keep-Out Layer:
  lines w6: 0,196.85 ccw(c196.82,196.84) 7.07,144.56 ccw(c16.56,147.17) 19.67,137.83 83.54,159.1 ccw(c80.42,168.44) 89.98,170.78 cw(c196.85,196.86) 297.79,240.58 301.22,231.62 cw(c196.85,196.85) 170.78,89.98 ccw(c168.44,80.42) 159.1,83.54 137.83,19.67 ccw(c147.17,16.56) 144.56,7.07 ccw(c196.83,196.85) 195.06,0.01 196.85,0 3740.16,0 ccw(c3740.16,196.85) 3794.08,7.53 3794.02,7.65 ccw(c3789.84,16.56) 3799.18,19.67 3777.91,83.54 ccw(c3768.57,80.42) 3766.23,89.98 cw(c3740.16,196.85) 3635.79,231.62 3639.22,240.58 cw(c3740.16,196.86) 3847.02,170.78 ccw(c3856.59,168.44) 3853.47,159.1 3917.33,137.83 ccw(c3920.44,147.17) 3929.67,143.73 3929.7,143.72 ccw(c3740.16,196.87) 3937.01,196.85 3937.01,1574.8 3936.26,1591.93 ccw(c3740.12,1574.81) 3929.99,1626.9 ccw(c3920.45,1624.48) 3917.33,1633.82 3853.47,1612.55 ccw(c3856.58,1603.21) 3847.02,1600.9 cw(c3740.16,1574.8) 3714.62,1467.81 3705.39,1470.44 cw(c3740.15,1574.8) 3765.69,1681.8 3766.48,1681.61 ccw(c3768.57,1691.22) 3777.9,1688.1 3799.16,1751.93 ccw(c3789.83,1755.09) 3792.87,1764.46 ccw(c3740.16,1574.81) 3740.16,1771.65 196.85,1771.65 195.06,1771.65 ccw(c196.87,1574.81) 144.56,1764.58 ccw(c147.17,1755.09) 137.83,1751.98 159.1,1688.12 ccw(c168.44,1691.24) 170.78,1681.67 cw(c196.86,1574.8) 301.22,1540.04 297.79,1531.07 cw(c196.85,1574.8) 89.98,1600.88 ccw(c80.42,1603.22) 83.54,1612.55 19.67,1633.82 ccw(c16.56,1624.48) 7.07,1627.1 ccw(c196.86,1574.82) 0,1574.8 0,196.85

## Other copper
Bottom:
  pour cut-out: 672,988 672,907 742,907 742,817 1163,817 1163,1083 808.76,1083 742,1016.24 742,988

## Silkscreen, mask and mechanical layers (free items; w line width, h text height)
Top Overlay:
  text ">PCB_VERSION" at 2157.88,1710.43 h59.5
  text "BOOTSEL" at 3385.46,1610 h27.2
Bottom Overlay:
  lines w6: 2761,982 2765,978 3011,978 3021,988 ; 2773,1101 2923,1101 ; 2990,1370 2990,1144 3006,1128
  text "RUN" at 2893.3,1117.51 h42.5
  text ">PCB_VERSION" at 1204,125 h59.5
Dimension:
  lines w6: 0,196.85 ccw(c196.82,196.84) 7.07,144.56 ccw(c16.56,147.17) 19.67,137.83 83.54,159.1 ccw(c80.42,168.44) 89.98,170.78 cw(c196.85,196.86) 297.79,240.58 301.22,231.62 cw(c196.85,196.85) 170.78,89.98 ccw(c168.44,80.42) 159.1,83.54 137.83,19.67 ccw(c147.17,16.56) 144.56,7.07 ccw(c196.83,196.85) 195.06,0.01 196.85,0 3740.16,0 ccw(c3740.16,196.85) 3794.08,7.53 3794.02,7.65 ccw(c3789.84,16.56) 3799.18,19.67 3777.91,83.54 ccw(c3768.57,80.42) 3766.23,89.98 cw(c3740.16,196.85) 3635.79,231.62 3639.22,240.58 cw(c3740.16,196.86) 3847.02,170.78 ccw(c3856.59,168.44) 3853.47,159.1 3917.33,137.83 ccw(c3920.44,147.17) 3929.67,143.73 3929.7,143.72 ccw(c3740.16,196.87) 3937.01,196.85 3937.01,1574.8 3936.26,1591.93 ccw(c3740.12,1574.81) 3929.99,1626.9 ccw(c3920.45,1624.48) 3917.33,1633.82 3853.47,1612.55 ccw(c3856.58,1603.21) 3847.02,1600.9 cw(c3740.16,1574.8) 3714.62,1467.81 3705.39,1470.44 cw(c3740.15,1574.8) 3765.69,1681.8 3766.48,1681.61 ccw(c3768.57,1691.22) 3777.9,1688.1 3799.16,1751.93 ccw(c3789.83,1755.09) 3792.87,1764.46 ccw(c3740.16,1574.81) 3740.16,1771.65 196.85,1771.65 195.06,1771.65 ccw(c196.87,1574.81) 144.56,1764.58 ccw(c147.17,1755.09) 137.83,1751.98 159.1,1688.12 ccw(c168.44,1691.24) 170.78,1681.67 cw(c196.86,1574.8) 301.22,1540.04 297.79,1531.07 cw(c196.85,1574.8) 89.98,1600.88 ccw(c80.42,1603.22) 83.54,1612.55 19.67,1633.82 ccw(c16.56,1624.48) 7.07,1627.1 ccw(c196.86,1574.82) 0,1574.8 0,196.85
Milling:
  lines w6: 1965,595 ccw(c1990,595) 1990,570 2990,570 ccw(c2990,595) 3015,595 ccw(c2990,595) 2990,620 1990,620 ccw(c1990,595) 1965,595 ; 1965,695 ccw(c1990,695) 1990,670 2990,670 ccw(c2990,695) 3015,695 ccw(c2990,695) 2990,720 1990,720 ccw(c1990,695) 1965,695 ; 1965,795 ccw(c1990,795) 1990,770 2990,770 ccw(c2990,795) 3015,795 ccw(c2990,795) 2990,820 1990,820 ccw(c1990,795) 1965,795 ; 2195,495 ccw(c2220,495) 2220,470 2990,470 ccw(c2990,495) 3015,495 ccw(c2990,495) 2990,520 2220,520 ccw(c2220,495) 2195,495
tDocu:
  lines w6: 0,875.98 3937.01,875.98
  lines w10: 1032.68,1614.17 3788.58,1614.17
tPlace:
  drawing of 1851 lines, arcs and shapes, not listed
  text "Fastboot SW" at 1098.43,1693.7 h27.2
  text "FB" at 1568.99,1623.35 h34 r90
  text "HB" at 3760,660 h34 r90
  text "3V3" at 490,110 h34 r90
  text "5V" at 1315,95 h34 r90
bPlace:
  drawing of 1844 lines, arcs and shapes, not listed
  text "TX" at 3400,1685 h34
  text "RX" at 3400,1625 h34
  text "IO6" at 3540,1610 h34
  text "IO5" at 3495,1555 h34
  text "IO4" at 3530,1490 h34
  text "IO3" at 3525,1430 h34
  text "IO1" at 3758.64,1416.01 h34
  text "IO2" at 3490,1370 h34
  text "IO0" at 3515,1280 h34
  text "A3" at 3695,945 h34
  text "A2" at 3485,885 h34 r270
  text "A1" at 3425,835 h34 r270
  text "A0" at 3371.01,833.35 h34 r270
Document:
  lines w6: 1082.68,196.85 1082.68,1614.17 ; 3838.58,196.85 3838.58,1614.17

## Dimensions
2760,1770 to 2760,1965 on tDocu
1510,450 to 1510,570 on tFinish
1300,450 to 1515,450 on tFinish

## Text inside footprints (layer, text, board x,y; h text height)
D2: Measures "0.071in/1.803mm" at 2933,819 h21.25 r270; Measures "0.053in/1.346mm" at 3093,404 h21.25 r270; Measures "0.016in/0.406mm" at 3093,487 h21.25 r270; Measures "0.018in/0.457mm" at 3183,859 h21.25 r270; Measures "0.106in/2.692mm" at 3283,819 h21.25 r270; Measures "Alt 2 Padstyle: OX90Y60D30P" at 2622,1243 h42.5 r270; Measures "Alt 1 Padstyle: OX60Y90D30P" at 2697,1243 h42.5 r270; Measures "Default Padstyle: RX41p5Y16D0T" at 2772,1304 h42.5 r270
D3: Measures "0.071in/1.803mm" at 3512,666 h21.25 r90; Measures "0.053in/1.346mm" at 3352,1081 h21.25 r90; Measures "0.016in/0.406mm" at 3352,998 h21.25 r90; Measures "0.018in/0.457mm" at 3262,626 h21.25 r90; Measures "0.106in/2.692mm" at 3162,666 h21.25 r90; Measures "Alt 2 Padstyle: OX90Y60D30P" at 3823,242 h42.5 r90; Measures "Alt 1 Padstyle: OX60Y90D30P" at 3748,242 h42.5 r90; Measures "Default Padstyle: RX41p5Y16D0T" at 3673,181 h42.5 r90
D4: Measures "0.071in/1.803mm" at 3612,321 h21.25 r90; Measures "0.053in/1.346mm" at 3452,736 h21.25 r90; Measures "0.016in/0.406mm" at 3452,653 h21.25 r90; Measures "0.018in/0.457mm" at 3362,281 h21.25 r90; Measures "0.106in/2.692mm" at 3262,321 h21.25 r90; Measures "Alt 2 Padstyle: OX90Y60D30P" at 3923,-103 h42.5 r90; Measures "Alt 1 Padstyle: OX60Y90D30P" at 3848,-103 h42.5 r90; Measures "Default Padstyle: RX41p5Y16D0T" at 3773,-164 h42.5 r90
D5: Measures "0.112in/2.845mm" at 2795,-19 h21.25 r90; Measures "0.071in/1.803mm" at 2627,416 h21.25 r90; Measures "0.028in/0.711mm" at 2627,336 h21.25 r90; Measures "0.02in/0.508mm" at 2531,-74 h21.25 r90; Measures "0.152in/3.861mm" at 2431,-19 h21.25 r90; Measures "Alt 2 Padstyle: OX90Y60D30P" at 3104,-443 h42.5 r90; Measures "Alt 1 Padstyle: OX60Y90D30P" at 3029,-443 h42.5 r90; Measures "Default Padstyle: RX36Y28D0T" at 2954,-459 h42.5 r90; tDocu "*" at 2640,71 h42.5 r90
D6: Measures "0.112in/2.845mm" at 2885,-19 h21.25 r90; Measures "0.071in/1.803mm" at 2717,416 h21.25 r90; Measures "0.028in/0.711mm" at 2717,336 h21.25 r90; Measures "0.02in/0.508mm" at 2621,-74 h21.25 r90; Measures "0.152in/3.861mm" at 2521,-19 h21.25 r90; Measures "Alt 2 Padstyle: OX90Y60D30P" at 3194,-443 h42.5 r90; Measures "Alt 1 Padstyle: OX60Y90D30P" at 3119,-443 h42.5 r90; Measures "Default Padstyle: RX36Y28D0T" at 3044,-459 h42.5 r90; tDocu "*" at 2730,71 h42.5 r90
D7: Measures "0.071in/1.803mm" at 3236,478 h21.25; Measures "0.053in/1.346mm" at 3651,638 h21.25; Measures "0.016in/0.406mm" at 3568,638 h21.25; Measures "0.018in/0.457mm" at 3196,728 h21.25; Measures "0.106in/2.692mm" at 3236,828 h21.25; Measures "Alt 2 Padstyle: OX90Y60D30P" at 2812,167 h42.5; Measures "Alt 1 Padstyle: OX60Y90D30P" at 2812,242 h42.5; Measures "Default Padstyle: RX41p5Y16D0T" at 2751,317 h42.5
D9: Measures "0.071in/1.803mm" at 3277,376 h21.25 r90; Measures "0.053in/1.346mm" at 3117,791 h21.25 r90; Measures "0.016in/0.406mm" at 3117,708 h21.25 r90; Measures "0.018in/0.457mm" at 3027,336 h21.25 r90; Measures "0.106in/2.692mm" at 2927,376 h21.25 r90; Measures "Alt 2 Padstyle: OX90Y60D30P" at 3588,-48 h42.5 r90; Measures "Alt 1 Padstyle: OX60Y90D30P" at 3513,-48 h42.5 r90; Measures "Default Padstyle: RX41p5Y16D0T" at 3438,-109 h42.5 r90
J2: Measures "0in/0mm" at 1371.6,1713.75 h21.25; Measures "0.185in/4.699mm" at 1413.6,1084.75 h21.25; Measures "0.1in/2.54mm" at 989.6,1084.75 h21.25; Measures "0.665in/16.891mm" at 1277.6,984.75 h21.25; Measures "0.25in/6.35mm" at 1311.6,1084.75 h21.25; Measures "-0.08in/-2.032mm" at 1981.6,1359.75 h21.25; Measures "0.032in/0.813mm" at 495.6,1275.75 h21.25; Measures "0.364in/9.246mm" at 1470.6,784.75 h21.25; Measures "0.788in/20.015mm" at 1277.6,684.75 h21.25; Measures "1.184in/30.074mm" at 1869.6,884.75 h21.25; Measures "0.28in/7.112mm" at 2181.6,1399.75 h21.25; Measures "0.02in/0.5mm" at 1598.6,1713.75 h21.25; Measures "0.235in/5.969mm" at 595.6,1399.75 h21.25; Measures "Alt 2 Padstyle: OX90Y60D30P" at 864.6,54.75 h42.5; Measures "Alt 1 Padstyle: EX40Y40D40P" at 864.6,129.75 h42.5; Measures "Keying Padstyle: EX60Y60D40P" at 834.6,204.75 h42.5; Measures "2nd Center Padstyle: RX100Y25D0T" at 743.6,279.75 h42.5; Measures "1st Center Padstyle: RX185Y25D0T" at 750.6,354.75 h42.5; Measures "Mounting Hole Padstyle: EX60Y60D40P" at 690.6,504.75 h42.5; Measures "Default Padstyle: RX8Y72D0T" at 871.6,579.75 h42.5; tDocu "2" at 1739.6,1573.75 h42.5; tDocu "1" at 1739.6,1189.75 h42.5; tDocu "60" at 1087.6,1573.75 h42.5; tDocu "59" at 1087.6,1189.75 h42.5; tPlace "2" at 1739.6,1573.75 h42.5; tPlace "1" at 1739.6,1189.75 h42.5; tPlace "60" at 1087.6,1573.75 h42.5; tPlace "59" at 1087.6,1189.75 h42.5
L1: Measures "0.035in/0.889mm" at 2556,112 h21.25 r90; Measures "0.122in/3.099mm" at 2656,156 h21.25 r90; Measures "0.122in/3.099mm" at 2412,559 h21.25 r90; Measures "0.122in/3.099mm" at 2412,459 h21.25 r90; Measures "Alt 2 Padstyle: OX90Y60D30P" at 2886,-268 h42.5 r90; Measures "Alt 1 Padstyle: OX60Y90D30P" at 2811,-268 h42.5 r90; Measures "Default Padstyle: RX46Y120D0T" at 2736,-306 h42.5 r90
Q1: Measures "0.056in/1.422mm" at 1484,607 h21.25 r270; Measures "0.119in/3.023mm" at 1766,268 h21.25 r270; Measures "0.019in/0.483mm" at 1666,268 h21.25 r270; Measures "0.075in/1.905mm" at 1302,268 h21.25 r270; Measures "0.018in/0.457mm" at 1524,-45 h21.25 r270; Measures "0.099in/2.515mm" at 1484,-121 h21.25 r270; Measures "Alt 2 Padstyle: OX90Y60D30P" at 966,692 h42.5 r270; Measures "Alt 1 Padstyle: OX60Y90D30P" at 1040,692 h42.5 r270; Measures "Bottom Padstyle: RX19Y34D0T" at 1116,692 h42.5 r270; Measures "Top Padstyle: RX19Y34D0T" at 1190,639 h42.5 r270
Q2: Measures "0.055in/1.397mm" at 1734,608 h21.25 r270; Measures "0.12in/3.048mm" at 2018,258 h21.25 r270; Measures "0.02in/0.508mm" at 1918,258 h21.25 r270; Measures "0.075in/1.9mm" at 1549,246 h21.25 r270; Measures "0.024in/0.61mm" at 1774,-45 h21.25 r270; Measures "0.104in/2.642mm" at 1734,-120 h21.25 r270; Measures "Alt 2 Padstyle: OX90Y60D30P" at 1213,693 h42.5 r270; Measures "Alt 1 Padstyle: OX60Y90D30P" at 1288,693 h42.5 r270; Measures "Bottom Padstyle: RX20Y40D0T" at 1363,693 h42.5 r270; Measures "Top Padstyle: RX20Y40D0T" at 1438,640 h42.5 r270
Q3: Measures "0.056in/1.422mm" at 187,518 h21.25; Measures "0.119in/3.023mm" at 526,800 h21.25; Measures "0.019in/0.483mm" at 526,700 h21.25; Measures "0.075in/1.905mm" at 526,336 h21.25; Measures "0.018in/0.457mm" at 839,558 h21.25; Measures "0.099in/2.515mm" at 915,518 h21.25; Measures "Alt 2 Padstyle: OX90Y60D30P" at 102,0 h42.5; Measures "Alt 1 Padstyle: OX60Y90D30P" at 102,74 h42.5; Measures "Bottom Padstyle: RX19Y34D0T" at 102,150 h42.5; Measures "Top Padstyle: RX19Y34D0T" at 155,224 h42.5